# Altium PCB DB32.PcbDoc (part 7 of 8)
Units mil, origin at the board's own origin, x right, y up, seen from the top; angles counter-clockwise.
Board outline 3236.22 x 4456.69 mil, 8 copper layers (Top Layer, MidLayer1, MidLayer2, GND-Layer5, MidLayer3, VCC, MidLayer4, Bottom Layer), stack 61.8 mil thick; 207 components, 474 nets, 1777 pads, 1474 vias.
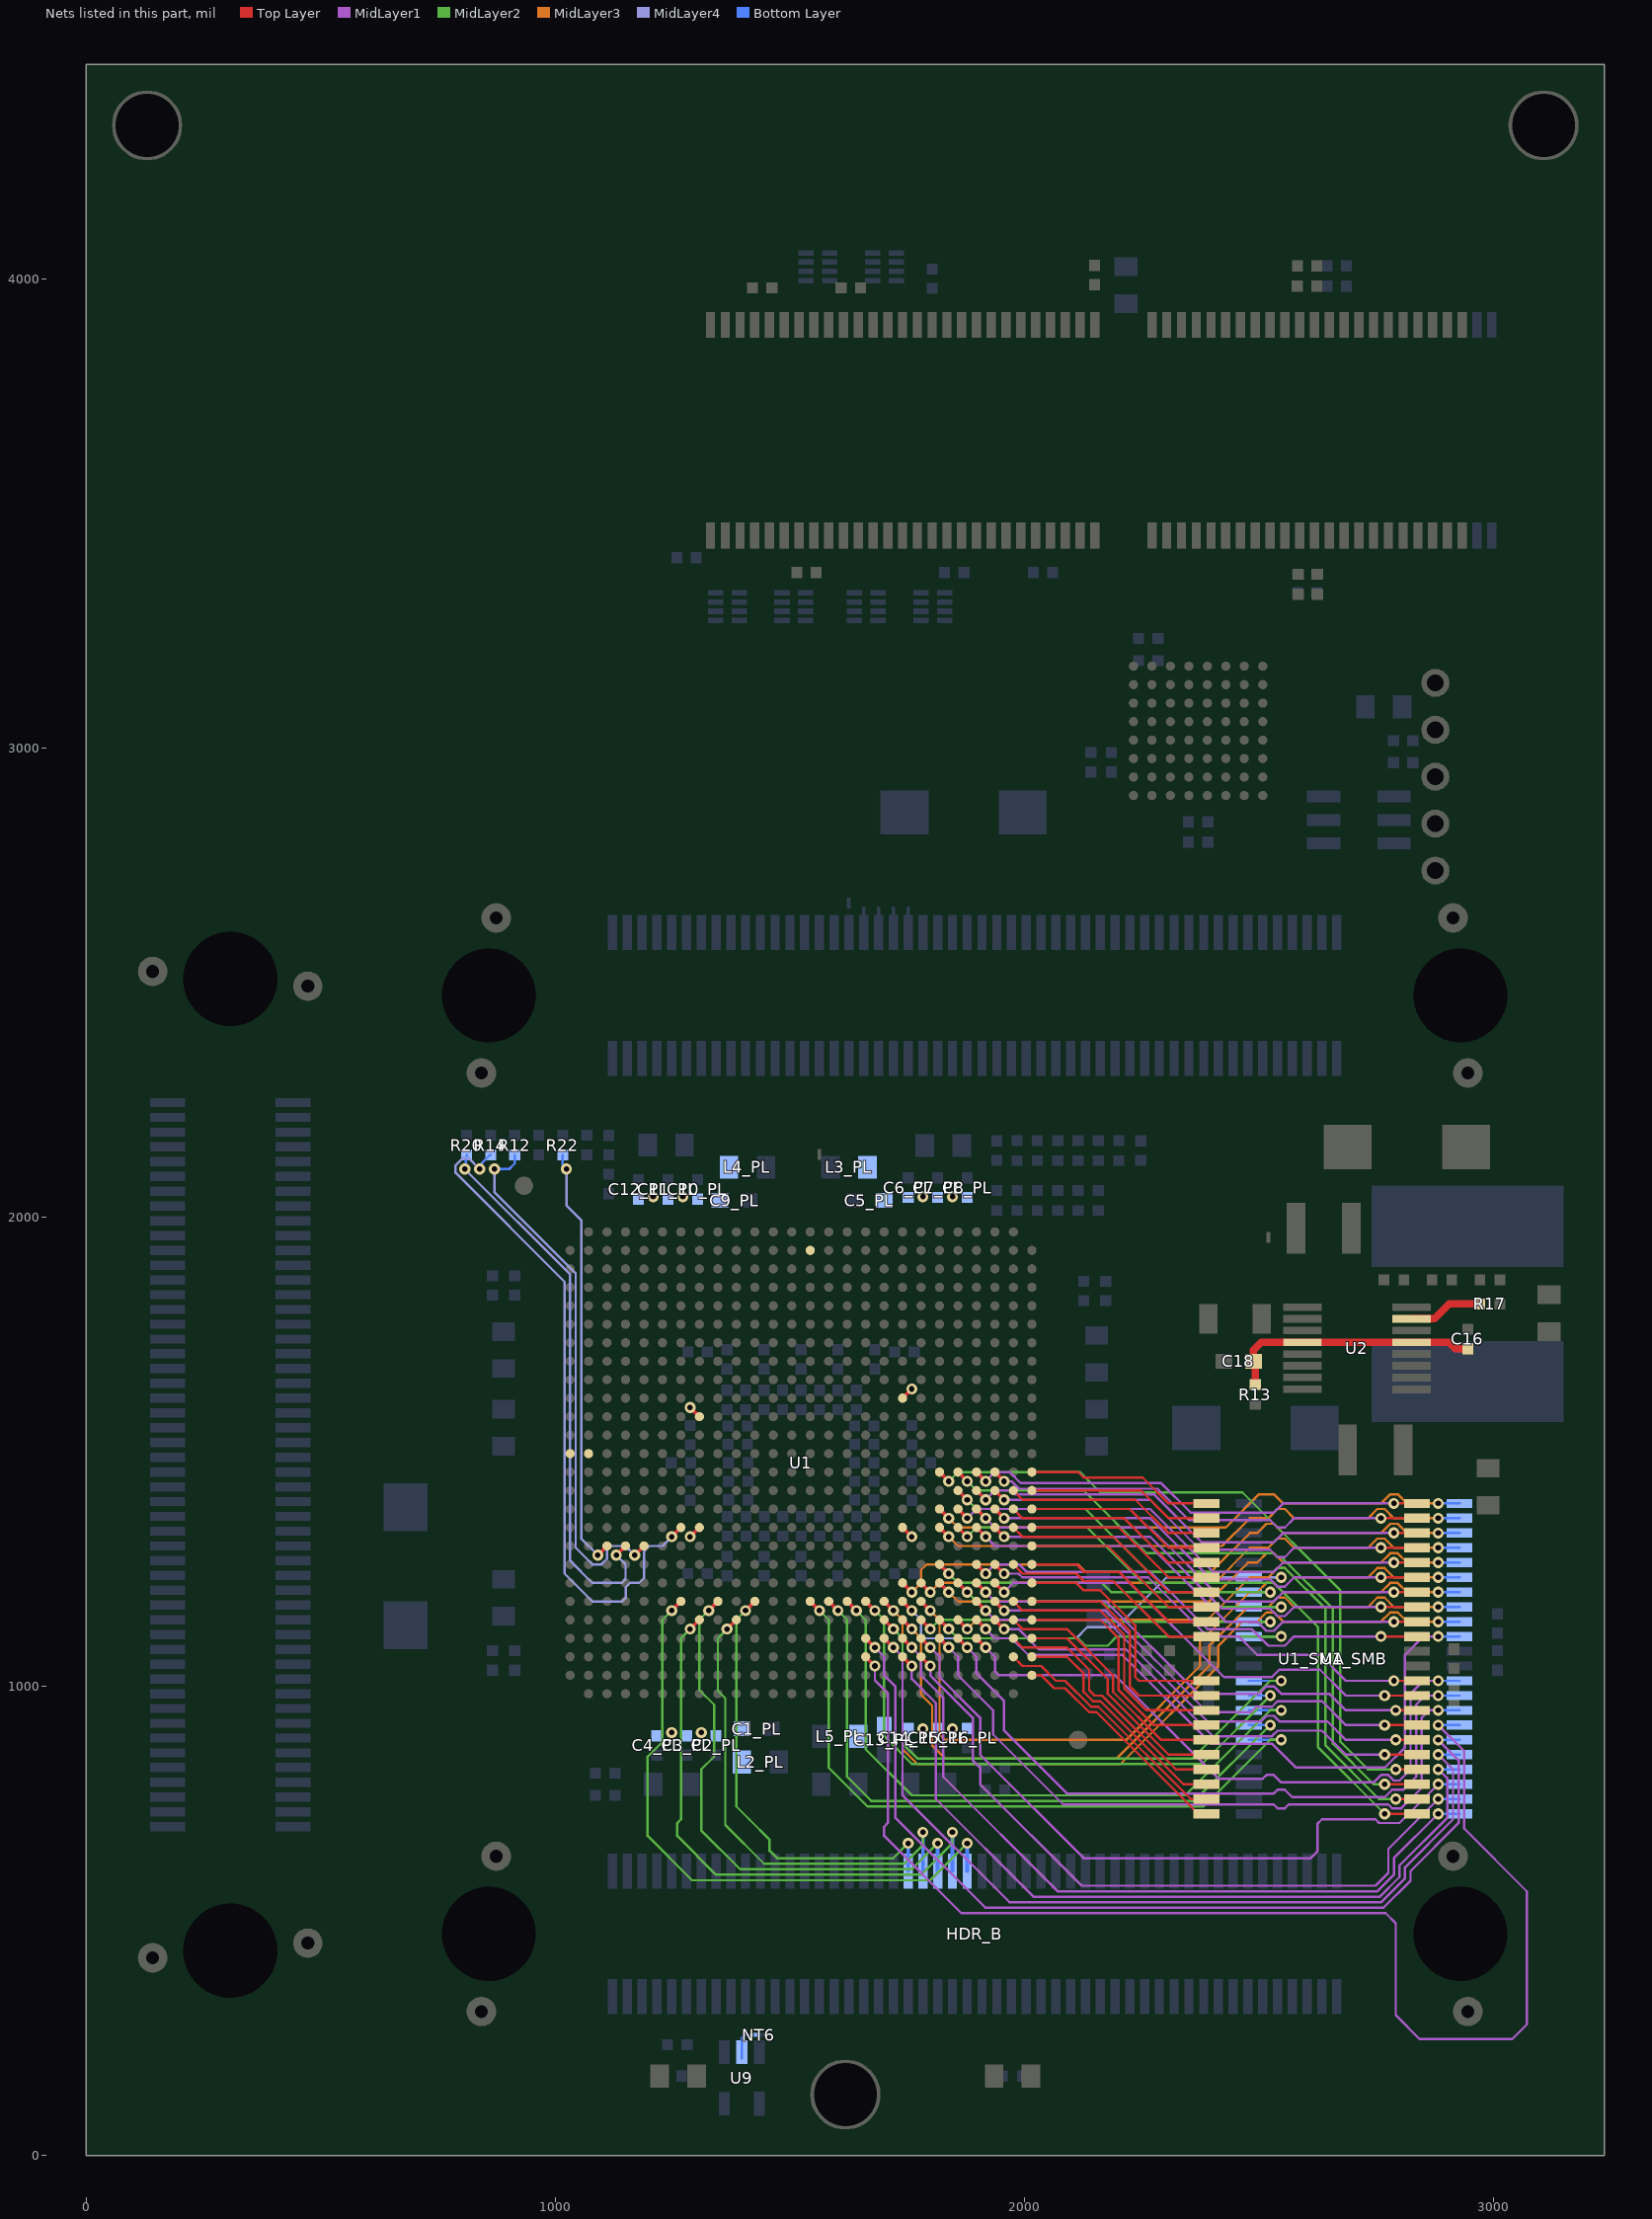
[diagram p13: the nets of this part, all layers, seen from the top]

## Via types
v1: diameter 23.62, hole 11.81, Top Layer to Bottom Layer, 839 vias
v2: diameter 23.62, hole 11.81, Top Layer to Bottom Layer, tented both sides, 499 vias
v3: diameter 27.56, hole 15.75, Top Layer to Bottom Layer, 135 vias
v4: diameter 23.62, hole 11.81, Top Layer to Bottom Layer, tented top, 1 vias

## Nets (pads, with @x,y where several pads share a name; then routed paths per layer and width w, separated by ;. In a path a pad name is that pad's centre, name@x,y a point inside that pad or via, vN(x,y) a via of type N, cw(c..) or ccw(c..) an arc to the next point about the centre after c; other vN are vias at no path point) (continued)
SRAM1_A10: U1.T21 U1_SMB.23 | length 1178.5
  Top Layer w7.87: U1.T21@1818.9,1377.95 v1(1838.59,1358.27)
  MidLayer3 w5: v1(1838.59,1358.27) 1858.27,1338.58 2078.74,1338.58 2090.55,1338.58 2429.16,1338.58 2500.01,1409.44 2531.7,1409.44 2551.38,1389.76 2759.84,1389.76 2779.53,1409.45 2795.28,1409.45 2814.97,1389.75 v1(2881.9,1389.75)
  Bottom Layer w5: v1(2881.9,1389.75) U1_SMB.23@2927.25,1389.75
SRAM1_A11: U1.U21 U1_SMB.24 | length 1181.8
  Top Layer w7.87: U1.U21@1818.9,1338.58 v1(1838.59,1318.9)
  MidLayer3 w5: v1(1838.59,1318.9) 1858.27,1299.21 2078.74,1299.21 2090.55,1299.21 2421.26,1299.21 2480.31,1358.27 2519.69,1358.27 2539.37,1377.95 2555.12,1377.95 2574.8,1358.27 2732.28,1358.27 2751.97,1377.95 2767.72,1377.95 2787.41,1358.26 v1(2881.9,1358.26)
  Bottom Layer w5: v1(2881.9,1358.26) U1_SMB.24@2927.25,1358.26
SRAM1_A12: U1.Y19 U1_SMB.25 | length 1309.2
  Top Layer w7.87: U1.Y19@1740.16,1220.47 v1(1759.84,1200.79)
  MidLayer3 w5: v1(1759.84,1200.79) 1779.53,1220.47 1779.53,1248.03 1791.34,1259.84 2078.74,1259.84 2090.55,1259.84 2114.17,1259.84 2129.92,1244.09 2397.66,1244.09 2480.33,1326.76 2496.27,1326.76 2515.96,1346.45 2531.7,1346.45 2551.38,1326.77 2759.84,1326.77 2779.53,1346.46 2795.28,1346.46 2814.97,1326.76 v1(2881.9,1326.76)
  Bottom Layer w5: v1(2881.9,1326.76) U1_SMB.25@2927.25,1326.76
SRAM1_A13: U1.Y20 U1_SMB.26 | length 1227.6
  Top Layer w7.87: U1.Y20@1779.53,1220.47 v1(1799.21,1200.79)
  MidLayer3 w5: v1(1799.21,1200.79) 1818.9,1220.47 2078.74,1220.47 2090.55,1220.47 2405.51,1220.47 2480.31,1295.28 2519.69,1295.28 2539.37,1314.96 2555.12,1314.96 2574.8,1295.28 2732.28,1295.28 2751.97,1314.96 2767.72,1314.96 2787.41,1295.27 v1(2881.9,1295.27)
  Bottom Layer w5: v1(2881.9,1295.27) U1_SMB.26@2927.25,1295.27
SRAM1_A14: U1.Y21 U1_SMB.27 | length 1191.5
  Top Layer w7.87: U1.Y21@1818.9,1220.47 v1(1838.58,1200.79)
  MidLayer3 w5: v1(1838.58,1200.79) 1858.27,1181.1 2078.74,1181.1 2090.55,1181.1 2393.7,1181.1 2476.37,1263.77 2496.27,1263.77 2515.96,1283.45 2531.7,1283.45 2551.38,1263.78 2759.84,1263.78 2779.53,1283.46 2795.28,1283.46 2814.97,1263.77 v1(2881.9,1263.77)
  Bottom Layer w5: v1(2881.9,1263.77) U1_SMB.27@2927.25,1263.77
SRAM1_A15: U1.AC20 U1_SMB.42 | length 1519.6
  Top Layer w7.87: U1.AC20@1779.53,1102.36 v1(1799.21,1082.68)
  MidLayer1 w5: v1(1799.21,1082.68) 1818.9,1062.99 1818.9,1019.69 1905.51,933.07 1905.51,921.26 1905.51,909.45 1905.51,854.33 2125.98,633.86 2610.24,633.86 2624.26,647.88 2624.26,706.94 2633.86,716.54 2748.03,716.54 2755.91,708.66 2799.21,708.66 v1(2881.9,791.33)
  Bottom Layer w5: v1(2881.9,791.33) U1_SMB.42@2927.25,791.33
SRAM1_A16: U1.AD20 U1_SMB.43 | length 1541.7
  Top Layer w7.87: U1.AD20@1779.53,1062.99 v1(1799.21,1043.31)
  MidLayer1 w5: v1(1799.21,1043.31) 1799.21,1023.62 1889.76,933.07 1889.76,921.26 1889.76,909.45 1889.76,842.52 1905.51,826.77 1905.51,791.34 2121.8,575.05 2748.28,575.05 2775.59,602.36 2775.59,653.54 v1(2881.9,759.83)
  Bottom Layer w5: v1(2881.9,759.83) U1_SMB.43@2927.25,759.83
SRAM1_A17: U1.AC19 U1_SMB.44 | length 1621.8
  Top Layer w7.87: U1.AC19@1740.16,1102.36 v1(1759.84,1082.68)
  MidLayer1 w5: v1(1759.84,1082.68) 1779.53,1062.99 1779.53,1023.62 1826.77,976.38 1826.77,921.26 1826.77,911.26 1826.77,807.09 2070.62,563.24 2752.21,563.24 2787.4,598.43 2787.4,633.86 v1(2881.9,728.34)
  Bottom Layer w5: v1(2881.9,728.34) U1_SMB.44@2927.25,728.34
SRAM1_A18: U1.AB22 U1_SMB.28 | length 1155.4
  Top Layer w7.87: U1.AB22@1858.27,1141.73 v1(1877.95,1122.05)
  MidLayer3 w5: v1(1877.95,1122.05) 1897.64,1141.73 2078.74,1141.73 2090.55,1141.73 2389.76,1141.73 2480.31,1232.28 2519.69,1232.28 2539.37,1251.97 2555.12,1251.97 2574.8,1232.28 2732.28,1232.28 2751.97,1251.97 2767.72,1251.97 2787.41,1232.28 v1(2881.9,1232.27)
  Bottom Layer w5: v1(2881.9,1232.27) U1_SMB.28@2927.25,1232.27
SRAM1_D0: U1.AA15 U1_SMB.7 | length 1429.5
  Top Layer w7.87: U1.AA15@1582.68,1181.1 v1(1602.36,1161.42)
  MidLayer2 w5: v1(1602.36,1161.42) 1622.05,1141.73 1622.05,921.26 1622.05,909.45 1622.05,807.09 1673.23,755.91 2362.2,755.91 2523.6,917.3 v1(2523.83,917.3)
  Bottom Layer w5: U1_SMB.7@2478.43,917.32 v1(2523.83,917.3) v1@2527.77,917.3
SRAM1_D1: U1.AA16 U1_SMB.8 | length 1405.6
  Top Layer w7.87: U1.AA16@1622.05,1181.1 v1(1641.73,1161.42)
  MidLayer2 w5: v1(1641.73,1161.42) 1661.42,1141.73 1661.42,921.26 1661.42,909.45 1661.42,866.14 1759.84,767.72 2342.52,767.72 2523.62,948.82 v1(2547.24,948.82)
  Bottom Layer w5: U1_SMB.8@2478.43,948.82 v1(2547.24,948.82) v1@2551.18,948.82
SRAM1_D2: U1.AA17 U1_SMB.9 | length 1261.1
  Top Layer w7.87: U1.AA17@1661.42,1181.1 v1(1681.1,1161.42)
  MidLayer2 w5: v1(1681.1,1161.42) 1700.79,1141.73 1700.79,921.26 1700.79,909.45 1700.79,893.7 1759.84,834.65 2378.17,834.65 v1(2523.83,980.31) v1@2523.61,980.31
  Bottom Layer w5: U1_SMB.9@2478.43,980.32 v1(2523.83,980.31) v1@2527.77,980.31
SRAM1_D3: U1.AB18 U1_SMB.10 | length 1241.5
  Top Layer w7.87: U1.AB18@1700.79,1141.73 v1(1720.47,1122.05)
  MidLayer2 w5: v1(1720.47,1122.05) 1740.16,1102.36 1740.16,921.26 1740.16,909.45 1740.16,877.95 1771.65,846.46 2358.27,846.46 2523.62,1011.81 v1(2547.24,1011.81)
  Bottom Layer w5: U1_SMB.10@2478.43,1011.81 v1(2547.24,1011.81) v1@2551.18,1011.81
SRAM1_D4: U1.AB21 U1_SMB.13 | length 832.1
  Top Layer w7.87: U1.AB21@1818.9,1141.73 v1(1838.58,1122.05)
  MidLayer2 w5: v1(1838.58,1122.05) 1858.27,1102.36 2078.74,1102.36 2090.55,1102.36 2114.17,1102.36 2129.92,1086.61 2177.17,1086.61 2196.85,1106.3 v1(2547.24,1106.3)
  Bottom Layer w5: U1_SMB.13@2478.43,1106.3 v1(2547.24,1106.3) v1@2551.18,1106.3
SRAM1_D5: U1.AB20 U1_SMB.14 | length 811.6
  Top Layer w7.87: U1.AB20@1779.53,1141.73 v1(1799.21,1122.05)
  MidLayer2 w5: v1(1799.21,1122.05) 1818.9,1141.73 2078.74,1141.73 2090.55,1141.73 2169.28,1141.73 2173.23,1137.79 v1(2523.83,1137.79)
  Bottom Layer w5: U1_SMB.14@2478.43,1137.8 v1(2523.83,1137.79) v1@2527.77,1137.79
SRAM1_D6: U1.Y22 U1_SMB.15 | length 782.9
  Top Layer w7.87: U1.Y22@1858.27,1220.47 v1(1877.95,1200.79)
  MidLayer2 w5: v1(1877.95,1200.79) 1897.64,1181.1 2078.74,1181.1 2090.55,1181.1 2165.35,1181.1 2177.17,1169.29 v1(2547.24,1169.29)
  Bottom Layer w5: U1_SMB.15@2478.43,1169.29 v1(2547.24,1169.29) v1@2551.18,1169.29
SRAM1_D7: U1.W21 U1_SMB.16 | length 778.7
  Top Layer w7.87: U1.W21@1818.9,1259.84 v1(1838.59,1240.16)
  MidLayer2 w5: v1(1838.59,1240.16) 1858.27,1220.47 2078.74,1220.47 2090.55,1220.47 2165.35,1220.47 2185.04,1200.79 v1@2523.83,1200.79
  Bottom Layer w5: U1_SMB.16@2478.44,1200.78 v1(2523.83,1200.78) v1@2527.77,1200.78
SRAM1_D8: U1.AA20 U1_SMB.29 | length 1606.1
  Top Layer w7.87: U1.AA20@1779.53,1181.1 v1(1799.21,1161.42)
  MidLayer3 w5: v1(1799.21,1161.42) 1818.9,1141.73 1818.9,921.26 1818.9,909.45 1818.9,897.64 1830.71,885.83 2216.54,885.83 2374.02,1043.31 2374.02,1094.49 2480.3,1200.78 2496.27,1200.78 2515.96,1220.46 2531.7,1220.46 2551.38,1200.79 2759.84,1200.79 2779.53,1220.47 2795.28,1220.47 2814.97,1200.78 v1(2881.9,1200.78)
  Bottom Layer w5: v1(2881.9,1200.78) U1_SMB.29@2927.25,1200.78
SRAM1_D9: U1.AB19 U1_SMB.30 | length 1621
  Top Layer w7.87: U1.AB19@1740.16,1141.73 v1(1759.84,1122.05)
  MidLayer3 w5: v1(1759.84,1122.05) 1779.53,1102.36 1779.53,982.28 1803.15,958.66 1803.15,921.26 1803.15,909.45 1803.15,874.02 1830.71,846.46 2196.85,846.46 2393.7,1043.31 2393.7,1086.61 2476.38,1169.29 2519.69,1169.29 2539.37,1188.98 2555.12,1188.98 2574.8,1169.29 2732.28,1169.29 2751.97,1188.98 2767.72,1188.98 2787.41,1169.29 v1(2881.9,1169.28)
  Bottom Layer w5: v1(2881.9,1169.28) U1_SMB.30@2927.25,1169.28
SRAM1_D10: U1.AA18 U1_SMB.31 | length 1715
  Top Layer w7.87: U1.AA18@1700.79,1181.1 v1(1720.47,1161.42)
  MidLayer3 w5: v1(1720.47,1161.42) 1740.16,1141.73 1740.16,921.26 1740.16,909.45 1740.16,866.14 1771.65,834.65 2204.72,834.65 2413.39,1043.31 2413.39,1086.61 2464.56,1137.79 2496.27,1137.79 2515.96,1157.47 2531.7,1157.47 2551.38,1137.8 2759.84,1137.8 2779.53,1157.48 2795.28,1157.48 2814.97,1137.79 v1(2881.9,1137.79)
  Bottom Layer w5: v1(2881.9,1137.79) U1_SMB.31@2927.25,1137.79
SRAM1_D11: U1.AB23 U1_SMB.32 | length 1395.5
  Top Layer w7.87: U1.AB23@1897.64,1141.73 v1(1917.32,1122.05)
  MidLayer1 w5: v1(1917.32,1122.05) 1937.01,1102.36 1972.44,1102.36 2007.88,1066.93 2078.74,1066.93 2090.55,1066.93 2208.66,1066.93 2397.64,877.95 2527.56,877.95 2578.75,826.76 2767.71,826.76 2811.02,870.08 2811.02,1066.93 2850.39,1106.3 2862.59,1106.3 ; 2858.28,1106.29 v1(2881.9,1106.29)
  Bottom Layer w5: v1(2881.9,1106.29) U1_SMB.32@2927.25,1106.29
SRAM1_D12: U1.AC23 U1_SMB.35 | length 1403.6
  Top Layer w7.87: U1.AC23@1897.64,1102.36 v1(1917.33,1082.68)
  MidLayer1 w5: 2862.21,1011.8 v1(2881.9,1011.8) ; 2862.2,1011.81 2850.39,1011.81 2822.83,984.25 2822.83,822.83 2799.21,799.21 2787.4,799.21 2775.6,811.02 2759.84,811.02 2744.09,795.27 2547.24,795.27 2531.5,811.02 2515.75,811.02 2507.87,803.15 2413.39,803.15 2192.91,1023.62 2090.55,1023.62 2078.74,1023.62 1944.88,1023.62 1937.01,1031.5 1937.01,1062.99 ; 1937.01,1062.99 v1(1917.33,1082.68) 1937.01,1062.99
  Bottom Layer w5: v1(2881.9,1011.8) U1_SMB.35@2927.25,1011.8
SRAM1_D13: U1.AC22 U1_SMB.36 | length 1453
  Top Layer w7.87: U1.AC22@1858.27,1102.36 v1(1877.96,1082.68)
  MidLayer1 w5: v1(1877.96,1082.68) 1897.64,1062.99 1897.64,1027.56 1956.69,968.5 1956.69,921.26 1956.69,909.45 1956.69,905.51 2090.55,771.65 2531.5,771.65 2539.37,779.53 2555.12,779.53 2570.87,763.78 2767.71,763.77 2783.46,779.52 2807.08,779.52 2834.65,807.09 2834.65,960.63 2854.33,980.32 2862.2,980.32 v1(2881.9,980.31)
  Bottom Layer w5: v1(2881.9,980.31) U1_SMB.36@2927.25,980.31
SRAM1_D14: U1.AC21 U1_SMB.37 | length 1492
  Top Layer w7.87: U1.AC21@1818.9,1102.36 v1(1838.59,1082.68)
  MidLayer1 w5: v1(1838.59,1082.68) 1858.27,1062.99 1858.27,1023.62 1933.07,948.82 1933.07,921.26 1933.07,909.45 1933.07,897.64 2082.68,748.03 2531.5,748.03 2539.37,740.16 2555.12,740.16 2562.99,748.03 2775.59,748.03 2783.46,740.16 2803.15,740.16 2846.46,783.46 2846.46,933.07 2862.2,948.82 v1(2881.9,948.81)
  Bottom Layer w5: v1(2881.9,948.81) U1_SMB.37@2927.25,948.81
SRAM1_D15: U1.AD17 U1_SMB.38 | length 2843.4
  Top Layer w7.87: U1.AD17@1661.42,1062.99 v1(1681.1,1043.3)
  MidLayer1 w5: v1(1681.1,1043.3) 1681.1,1012.79 1708.66,985.23 1708.66,921.26 1708.66,909.45 1708.66,708.66 1700.79,700.79 1700.79,681.1 1865.16,516.73 2769.68,516.73 2791.34,495.08 2791.34,299.21 2842.52,248.03 3039.37,248.03 3070.87,279.53 3070.87,562.99 2937.01,696.85 2937.01,862.2 v1(2881.9,917.31)
  Bottom Layer w5: v1(2881.9,917.31) U1_SMB.38@2927.25,917.31
SRAM1_NBHE: U1.AC18 U1_SMB.40 | length 1901.6
  Top Layer w7.87: U1.AC18@1700.79,1102.36 v1(1720.47,1082.68)
  MidLayer1 w5: v1(1720.47,1082.68) 1740.16,1062.99 1740.16,921.26 1740.16,909.45 1740.16,767.72 1967.77,540.11 2760.58,540.11 2811.02,590.55 2811.02,614.17 2913.39,716.54 2913.39,822.83 v1(2881.9,854.32)
  Bottom Layer w5: v1(2881.9,854.32) U1_SMB.40@2927.25,854.32
SRAM1_NBLE: U1.AC17 U1_SMB.39 | length 2015.4
  Top Layer w7.87: U1.AC17@1661.42,1102.36 v1(1681.1,1082.68)
  MidLayer1 w5: v1(1681.1,1082.68) 1700.79,1062.99 1700.79,1023.62 1724.41,1000 1724.41,921.26 1724.41,909.45 1724.41,720.47 1916.34,528.54 2765.75,528.54 2822.83,585.63 2822.83,606.3 2925.2,708.66 2925.2,842.52 v1(2881.9,885.82)
  Bottom Layer w5: v1(2881.9,885.82) U1_SMB.39@2927.25,885.82
SRAM1_NCS: U1.AA14 U1_SMB.6 | length 1500.9
  Top Layer w7.87: U1.AA14@1543.31,1181.1 v1(1562.99,1161.42)
  MidLayer2 w5: v1(1562.99,1161.42) 1582.68,1141.73 1582.68,921.26 1582.68,909.45 1582.68,826.77 1665.35,744.09 2381.89,744.09 2523.62,885.83 v1(2547.24,885.83)
  Bottom Layer w5: U1_SMB.6@2478.43,885.83 v1(2547.24,885.83) v1@2551.18,885.83
SRAM1_NOE: U1.AD19 U1_SMB.41 | length 1749.5
  Top Layer w7.87: U1.AD19@1740.16,1062.99 v1(1759.84,1043.31)
  MidLayer1 w5: v1(1759.84,1043.31) 1759.84,1015.75 1811.02,964.57 1811.02,921.26 1811.02,909.45 1811.02,759.84 2019.19,551.67 2757.38,551.67 2799.21,593.5 2799.21,618.11 2901.57,720.47 2901.57,803.15 v1(2881.9,822.83)
  Bottom Layer w5: v1(2881.9,822.83) U1_SMB.41@2927.25,822.83
SRAM1_NWE: U1.AA19 U1_SMB.17 | length 984.7
  Top Layer w7.87: U1.AA19@1740.16,1181.1 v1(1759.84,1161.42)
  MidLayer4 w5: v1(1759.84,1161.42) 1779.53,1141.73 1779.53,1110.24 1787.4,1102.36 2078.74,1102.36 2090.55,1102.36 2110.24,1102.36 2133.86,1125.98 2196.85,1125.98 2303.15,1232.28 v1(2547.24,1232.28)
  Bottom Layer w5: U1_SMB.17@2478.43,1232.28 v1(2547.24,1232.28) v1@2551.18,1232.28
SRAM2_A0: U1.U22 U1_SMA.1 | length 1397.4
  Top Layer w5: v1(2767.69,728.34) U1_SMA.1@2836.69,728.35
  Top Layer w7.87: U1.U22@1858.27,1338.58 v1(1877.96,1318.9)
  MidLayer2 w5: v1(1877.96,1318.9) 1897.64,1338.58 2078.74,1338.58 2090.55,1338.58 2133.86,1338.58 2251.97,1220.47 2531.5,1220.47 2625.98,1125.98 2625.98,870.08 v1(2767.69,728.34)
SRAM2_A1: U1.R22 U1_SMA.2 | length 1428
  Top Layer w5: v1(2791.34,759.84) U1_SMA.2@2836.69,759.84
  Top Layer w7.87: U1.R22@1858.27,1417.32 v1(1877.96,1397.64)
  MidLayer2 w5: v1(1877.96,1397.64) 1897.64,1377.95 2078.74,1377.95 2090.55,1377.95 2129.92,1377.95 2263.78,1244.09 2531.5,1244.09 2539.37,1251.97 2555.12,1251.97 2641.73,1165.35 2641.73,874.02 2755.91,759.84 v1(2791.34,759.84)
SRAM2_A2: U1.P22 U1_SMA.3 | length 1422.4
  Top Layer w5: v1(2767.69,791.34) U1_SMA.3@2836.69,791.34
  Top Layer w7.87: U1.P22@1858.27,1456.69 v1(1877.96,1437.01)
  MidLayer2 w5: v1(1877.96,1437.01) 1897.64,1417.32 2078.74,1417.32 2090.55,1417.32 2125.98,1417.32 2259.84,1283.46 2531.5,1283.46 2539.37,1275.59 2547.24,1275.59 2657.48,1165.35 2657.48,877.95 2744.1,791.34 v1(2767.69,791.34)
SRAM2_A3: U1.P21 U1_SMA.4 | length 1485.8
  Top Layer w5: v1(2791.34,822.83) U1_SMA.4@2836.69,822.84
  Top Layer w7.87: U1.P21@1818.9,1456.69 v1(1838.59,1437.01)
  MidLayer2 w5: v1(1838.59,1437.01) 1858.27,1456.69 2078.74,1456.69 2090.55,1456.69 2118.11,1456.69 2161.42,1413.39 2464.57,1413.39 2673.23,1204.72 2673.23,881.89 2732.28,822.83 v1(2791.34,822.83)
SRAM2_A4: U1.AB24 U1_SMA.5 | length 1020.7
  Top Layer w5: v1(2767.69,854.33) U1_SMA.5@2836.69,854.33
  Top Layer w7.87: U1.AB24@1937.01,1141.73 v1(1956.69,1122.05)
  MidLayer1 w5: v1(1956.69,1122.05) 1987.21,1122.05 2030.51,1078.74 2078.74,1078.74 2090.55,1078.74 2216.54,1078.74 2401.57,893.7 2527.56,893.7 2539.37,905.51 2633.86,905.51 2685.04,854.33 v1@2759.84,854.31
SRAM2_A5: U1.T22 U1_SMA.18 | length 1058.4
  Top Layer w5: v1@2787.4,1263.77 U1_SMA.18@2836.71,1263.77
  Top Layer w7.87: U1.T22@1858.27,1377.95 v1(1877.96,1358.27)
  MidLayer1 w5: v1(1877.96,1358.27) 1897.64,1377.95 2078.74,1377.95 2090.55,1377.95 2267.72,1377.95 2401.57,1244.09 2531.5,1244.09 2551.18,1263.78 v1(2787.4,1263.78)
SRAM2_A6: U1.R24 U1_SMA.19 | length 966.6
  Top Layer w5: v1(2759.84,1295.28) U1_SMA.19@2836.69,1295.28
  Top Layer w7.87: U1.R24@1937.01,1417.32 v1(1956.7,1397.64)
  MidLayer1 w5: v1(1956.7,1397.64) 2078.74,1397.64 2090.55,1397.64 2267.72,1397.64 2374.02,1291.34 2523.62,1291.34 2539.37,1275.59 2555.12,1275.59 2574.8,1295.28 v1(2759.84,1295.28)
SRAM2_A7: U1.R23 U1_SMA.20 | length 1009.2
  Top Layer w5: v1(2787.4,1326.77) U1_SMA.20@2836.69,1326.77
  Top Layer w7.87: U1.R23@1897.64,1417.32 v1(1917.33,1397.64)
  MidLayer1 w5: v1(1917.33,1397.64) 1937.01,1417.32 1972.44,1417.32 1980.32,1409.45 2078.74,1409.45 2090.55,1409.45 2275.59,1409.45 2377.95,1307.09 2531.5,1307.09 2551.18,1326.77 v1(2787.4,1326.77)
SRAM2_A8: U1.P24 U1_SMA.21 | length 956.8
  Top Layer w5: v1(2759.84,1358.27) U1_SMA.21@2836.69,1358.27
  Top Layer w7.87: U1.P24@1937.01,1456.69 v1(1956.7,1437.01)
  MidLayer1 w5: v1(1956.7,1437.01) 1972.44,1437.01 1988.19,1421.26 2078.74,1421.26 2090.55,1421.26 2283.46,1421.26 2350.39,1354.33 2523.62,1354.33 2539.37,1338.58 2555.12,1338.58 2574.8,1358.27 v1(2759.84,1358.27)
SRAM2_A9: U1.P23 U1_SMA.22 | length 999.4
  Top Layer w5: v1(2787.4,1389.76) U1_SMA.22@2836.69,1389.76
  Top Layer w7.87: U1.P23@1897.64,1456.69 v1(1917.33,1437.01)
  MidLayer1 w5: v1(1917.33,1437.01) 1937.01,1456.69 1968.5,1456.69 1992.13,1433.07 2078.74,1433.07 2090.55,1433.07 2291.34,1433.07 2354.33,1370.08 2531.5,1370.08 2551.18,1389.76 v1(2787.4,1389.76)
SRAM2_A10: U1.P26 U1_SMA.23 | length 399.9
  Top Layer w5: U1.P26@2015.75,1456.69 2078.74,1456.69 2090.55,1456.69 2114.17,1456.69 2125.98,1444.88 2251.97,1444.88 2307.1,1389.76 U1_SMA.23@2387.87,1389.76
SRAM2_A11: U1.R26 U1_SMA.24 | length 396.6
  Top Layer w5: U1.R26@2015.75,1417.32 2078.74,1417.32 2090.55,1417.32 2248.03,1417.32 2307.09,1358.26 U1_SMA.24@2387.87,1358.27
SRAM2_A12: U1.R25 U1_SMA.25 | length 449
  Top Layer w5: U1.R25@1976.38,1417.32 1996.06,1397.64 2078.74,1397.64 2090.55,1397.64 2236.22,1397.64 2307.09,1326.76 U1_SMA.25@2387.87,1326.77
SRAM2_A13: U1.T26 U1_SMA.26 | length 406.4
  Top Layer w5: U1.T26@2015.75,1377.95 2078.74,1377.95 2090.55,1377.95 2224.41,1377.95 2307.09,1295.27 U1_SMA.26@2387.87,1295.28
SRAM2_A14: U1.T25 U1_SMA.27 | length 458.8
  Top Layer w5: U1.T25@1976.38,1377.95 1996.06,1358.27 2078.74,1358.27 2090.55,1358.27 2212.6,1358.27 2307.09,1263.77 U1_SMA.27@2387.89,1263.77
SRAM2_A15: U1.AD26 U1_SMA.42 | length 507.7
  Top Layer w5: U1.AD26@2015.75,1062.99 2078.74,1062.99 2090.55,1062.99 2125.98,1027.56 2125.98,988.19 2145.67,968.5 2161.42,968.5 2338.59,791.33 U1_SMA.42@2387.87,791.34
SRAM2_A16: U1.AD25 U1_SMA.43 | length 537.1
  Top Layer w5: U1.AD25@1976.38,1062.99 1996.06,1043.31 2035.43,1043.31 2066.93,1011.81 2078.74,1011.81 2086.61,1011.81 2141.73,956.69 2157.48,956.69 2354.34,759.83 U1_SMA.43@2387.87,759.84
SRAM2_A17: U1.AE26 U1_SMA.44 | length 494.5
  Top Layer w5: U1.AE26@2015.75,1023.62 2035.43,1023.62 2062.99,996.06 2078.74,996.06 2086.61,996.06 2137.8,944.88 2153.54,944.88 2370.09,728.34 U1_SMA.44@2387.87,728.35
SRAM2_A18: U1.U26 U1_SMA.28 | length 416.2
  Top Layer w5: U1.U26@2015.75,1338.58 2078.74,1338.58 2090.55,1338.58 2200.79,1338.58 2307.09,1232.28 U1_SMA.28@2387.89,1232.28
SRAM2_D0: U1.AA24 U1_SMA.7 | length 1020.9
  Top Layer w5: v1(2767.69,917.32) U1_SMA.7@2836.69,917.32
  Top Layer w7.87: U1.AA24@1937.01,1181.1 v1(1956.7,1161.42)
  MidLayer1 w5: v1(1956.7,1161.42) 2078.74,1161.42 2090.55,1161.42 2173.23,1161.42 2389.76,944.88 2482.35,944.88 2494.16,956.69 2527.58,956.69 2539.11,968.23 2539.11,968.5 2633.86,968.5 2685.06,917.3 v1@2759.84,917.3
SRAM2_D1: U1.Y23 U1_SMA.8 | length 1060.7
  Top Layer w5: v1(2791.34,948.82) U1_SMA.8@2836.69,948.82
  Top Layer w7.87: U1.Y23@1897.64,1220.47 v1(1917.32,1200.79)
  MidLayer1 w5: v1(1917.32,1200.79) 1937.01,1181.1 2078.74,1181.1 2090.55,1181.1 2173.23,1181.1 2370.08,984.25 2500,984.25 2515.75,1000 2531.5,1000 2547.24,984.25 2649.61,984.25 2685.04,948.83 v1@2787.41,948.83
SRAM2_D2: U1.Y24 U1_SMA.9 | length 1020.7
  Top Layer w5: v1(2767.69,980.31) U1_SMA.9@2836.69,980.32
  Top Layer w7.87: U1.Y24@1937.01,1220.47 v1(1956.69,1200.79)
  MidLayer1 w5: v1(1956.69,1200.79) 1976.38,1220.47 2078.74,1220.47 2090.55,1220.47 2224.41,1220.47 2425.2,1019.68 2527.56,1019.68 2543.31,1035.43 2629.92,1035.43 2685.04,980.32 ; 2685.04,980.29 v1@2759.84,980.29
SRAM2_D3: U1.W24 U1_SMA.10 | length 1002.4
  Top Layer w5: v1(2787.4,1011.81) U1_SMA.10@2836.69,1011.81
  Top Layer w7.87: U1.W24@1937.01,1259.84 v1(1956.7,1240.16)
  MidLayer1 w5: v1(1956.7,1240.16) 1987.21,1240.16 1995.08,1232.28 2078.74,1232.28 2090.55,1232.28 2263.78,1232.28 2389.76,1106.3 2456.69,1106.3 2496.06,1066.93 2629.92,1066.93 2685.03,1011.82 v1(2787.4,1011.81)
SRAM2_D4: U1.W23 U1_SMA.13 | length 1035.3
  Top Layer w5: v1(2759.84,1106.3) U1_SMA.13@2836.69,1106.3
  Top Layer w7.87: U1.W23@1897.64,1259.84 v1(1917.33,1240.16)
  MidLayer1 w5: v1(1917.33,1240.16) 1937.01,1259.84 1988.19,1259.84 2003.94,1244.09 2078.74,1244.09 2090.55,1244.09 2267.72,1244.09 2389.76,1122.05 2484.25,1122.05 2519.68,1086.62 2555.11,1086.62 2574.79,1106.31 v1(2759.84,1106.3)
SRAM2_D5: U1.U23 U1_SMA.14 | length 1038.6
  Top Layer w5: v1(2787.4,1137.8) U1_SMA.14@2836.69,1137.8
  Top Layer w7.87: U1.U23@1897.64,1338.58 v1(1917.33,1318.9)
  MidLayer1 w5: v1(1917.33,1318.9) 1937.01,1299.21 2078.74,1299.21 2090.55,1299.21 2267.72,1299.21 2429.13,1137.8 2496.06,1137.8 2515.75,1118.11 2531.49,1118.11 2551.17,1137.8 ; 2551.17,1137.8 v1(2787.4,1137.8)
SRAM2_D6: U1.U24 U1_SMA.15 | length 986.1
  Top Layer w5: v1(2759.84,1169.29) U1_SMA.15@2836.69,1169.29
  Top Layer w7.87: U1.U24@1937.01,1338.58 v1(1956.7,1318.9)
  MidLayer1 w5: v1(1956.7,1318.9) 2078.74,1318.9 2090.55,1318.9 2267.72,1318.9 2421.25,1165.36 2523.61,1165.36 2539.36,1149.61 2555.11,1149.61 2574.79,1169.3 v1(2759.84,1169.29)
SRAM2_D7: U1.T23 U1_SMA.16 | length 1028.8
  Top Layer w5: v1(2787.4,1200.79) U1_SMA.16@2836.69,1200.79
  Top Layer w7.87: U1.T23@1897.64,1377.95 v1(1917.33,1358.27)
  MidLayer1 w5: v1(1917.33,1358.27) 1937.01,1338.58 2078.74,1338.58 2090.55,1338.58 2267.72,1338.58 2425.2,1181.1 2531.49,1181.1 ; 2531.49,1181.11 2551.17,1200.8 ; 2551.17,1200.8 v1(2787.4,1200.79)
SRAM2_D8: U1.U25 U1_SMA.29 | length 468.6
  Top Layer w5: U1.U25@1976.38,1338.58 1996.06,1318.9 2078.74,1318.9 2090.55,1318.9 2188.98,1318.9 2307.09,1200.78 U1_SMA.29@2387.87,1200.79
SRAM2_D9: U1.V26 U1_SMA.30 | length 426
  Top Layer w5: U1.V26@2015.75,1299.21 2078.74,1299.21 2090.55,1299.21 2177.17,1299.21 2307.09,1169.28 U1_SMA.30@2387.87,1169.29
SRAM2_D10: U1.W26 U1_SMA.31 | length 422.7
  Top Layer w5: U1.W26@2015.75,1259.84 2078.74,1259.84 2090.55,1259.84 2110.24,1259.84 2125.98,1244.09 2200.79,1244.09 2307.09,1137.79 U1_SMA.31@2387.87,1137.8
SRAM2_D11: U1.W25 U1_SMA.32 | length 475.1
  Top Layer w5: U1.W25@1976.38,1259.84 1996.06,1240.16 2078.74,1240.16 2090.55,1240.16 2110.24,1240.16 2125.98,1224.41 2188.98,1224.41 2307.09,1106.29 U1_SMA.32@2387.87,1106.3
SRAM2_D12: U1.Y26 U1_SMA.35 | length 523.1
  Top Layer w5: U1.Y26@2015.75,1220.47 2078.74,1220.47 2090.55,1220.47 2110.24,1220.47 2125.98,1204.72 2161.42,1204.72 2236.22,1129.92 2236.22,1019.68 2244.1,1011.8 U1_SMA.35@2387.87,1011.81
SRAM2_D13: U1.AA26 U1_SMA.36 | length 524.5
  Top Layer w5: U1.AA26@2015.75,1181.1 2078.74,1181.1 2090.55,1181.1 2161.42,1181.1 2224.41,1118.11 2224.41,1000 2244.1,980.31 U1_SMA.36@2387.87,980.32
SRAM2_D14: U1.AA25 U1_SMA.37 | length 574.6
  Top Layer w5: U1.AA25@1976.38,1181.1 1996.06,1161.42 2078.74,1161.42 2090.55,1161.42 2161.42,1161.42 2212.6,1110.24 2212.6,996.06 2259.85,948.81 U1_SMA.37@2387.87,948.82
SRAM2_D15: U1.AB26 U1_SMA.38 | length 529.7
  Top Layer w5: U1.AB26@2015.75,1141.73 2078.74,1141.73 2090.55,1141.73 2161.42,1141.73 2200.79,1102.36 2200.79,992.13 2275.6,917.32 U1_SMA.38@2387.87,917.32
SRAM2_NBHE: U1.AC26 U1_SMA.40 | length 493.3
  Top Layer w5: U1.AC26@2015.75,1102.36 2078.74,1102.36 2090.55,1102.36 2177.17,1015.75 2177.17,984.25 2307.09,854.32 U1_SMA.40@2387.87,854.33
SRAM2_NBLE: U1.AB25 U1_SMA.39 | length 538.3
  Top Layer w5: U1.AB25@1976.38,1141.73 1996.06,1122.05 2078.74,1122.05 2090.55,1122.05 2188.98,1023.62 2188.98,988.19 2291.35,885.82 U1_SMA.39@2387.87,885.83
SRAM2_NCS: U1.AA23 U1_SMA.6 | length 1067.2
  Top Layer w5: v1(2791.34,885.83) U1_SMA.6@2836.69,885.83
  Top Layer w7.87: U1.AA23@1897.64,1181.1 v1(1917.33,1161.42)
  MidLayer1 w5: v1(1917.33,1161.42) 1937.01,1141.73 1976.38,1141.73 2078.74,1141.73 2090.55,1141.73 2173.23,1141.73 2389.76,925.2 2503.93,925.2 2515.75,937.01 2531.5,937.01 2543.31,925.2 2645.67,925.2 2685.03,885.83 v1@2787.41,885.83
SRAM2_NOE: U1.AC25 U1_SMA.41 | length 552.7
  Top Layer w5: U1.AC25@1976.38,1102.36 1996.06,1082.68 2078.74,1082.68 2090.55,1082.68 2137.8,1035.43 2137.8,992.13 2149.61,980.32 2165.35,980.32 2322.84,822.83 U1_SMA.41@2387.87,822.84
SRAM2_NWE: U1.T24 U1_SMA.17 | length 976.3
  Top Layer w5: v1(2759.84,1232.28) U1_SMA.17@2836.71,1232.28
  Top Layer w7.87: U1.T24@1937.01,1377.95 v1(1956.7,1358.27)
  MidLayer1 w5: v1(1956.7,1358.27) 2078.74,1358.27 2090.55,1358.27 2267.72,1358.27 2397.63,1228.35 2523.61,1228.35 2539.36,1212.61 2555.11,1212.61 2574.79,1232.29 v1(2759.84,1232.28)
STATUS_LED: NT6.1 U9.2 | length 70.8
  Bottom Layer w5: U9.2@1397.64,207.68 1397.64,250.22 1404.53,257.11 NT6.1@1423,257.11
SW0: HDR_B.42 U1.AA11 | length 951.1
  Top Layer w7.87: v1(1405.51,1161.42) U1.AA11@1425.2,1181.1
  MidLayer2 w5: v1(1405.51,1161.42) 1385.83,1141.73 1385.83,921.26 1385.83,909.45 1385.83,744.09 1413.39,716.54 1456.69,673.23 1456.69,649.61 1472.44,633.86 1720.47,633.86 v2(1751.97,665.35)
  Bottom Layer w7.87: HDR_B.42@1751.97,606.3 v2(1751.97,665.35)
SW1: HDR_B.44 U1.AB10 | length 1041.9
  Top Layer w7.87: v1(1366.14,1122.05) U1.AB10@1385.83,1141.73
  MidLayer2 w5: v1(1366.14,1122.05) 1346.46,1102.36 1346.46,990.15 1362.2,974.41 1362.2,921.26 1362.2,909.45 1362.2,704.72 1444.88,622.05 1744.09,622.05 1783.46,661.42 v2(1783.46,688.98)
  Bottom Layer w7.87: HDR_B.44@1783.47,606.3 v2(1783.46,688.98)
SW2: HDR_B.46 U1.AA9 | length 1149
  Top Layer w7.87: v1(1326.77,1161.42) U1.AA9@1346.46,1181.1
  MidLayer2 w5: v1(1326.77,1161.42) 1307.09,1141.73 1307.09,1086.61 1307.09,992.12 1338.58,960.63 1338.58,921.26 1338.58,909.45 1338.58,850.39 1311.02,822.83 1311.02,692.91 1393.7,610.24 1759.84,610.24 v2(1814.96,665.35)
  Bottom Layer w7.87: HDR_B.46@1814.96,606.3 v2(1814.96,665.35)
SW3: HDR_B.48 U1.AB8 | length 1235.1
  Top Layer w7.87: v1(1287.4,1122.05) U1.AB8@1307.09,1141.73
  MidLayer2 w5: v1(1287.4,1122.05) 1267.72,1102.36 1267.72,921.26 1267.72,909.45 1267.72,716.54 1259.84,708.66 1259.84,681.1 1342.52,598.43 1779.53,598.43 1846.46,665.35 v2(1846.46,688.98)
  Bottom Layer w7.87: HDR_B.48@1846.46,606.3 v2(1846.46,688.98)
SW4: HDR_B.50 U1.AA7 | length 1341.3
  Top Layer w7.87: v1(1248.03,1161.42) U1.AA7@1267.72,1181.1
  MidLayer2 w5: v1(1248.03,1161.42) 1228.35,1141.73 1228.35,921.26 1228.35,909.45 1228.35,881.89 1196.85,850.39 1196.85,681.1 1291.34,586.61 1799.21,586.61 v2(1877.95,665.35)
  Bottom Layer w7.87: HDR_B.50@1877.96,606.3 v2(1877.95,665.35)
TCK: R14.2 U1.U7 | length 1458.2
  Top Layer w7.87: v1(1248.03,1318.9) U1.U7@1267.72,1338.58
  MidLayer4 w5: v1(838.58,2102.36) 814.96,2125.98 803.15,2125.98 787.4,2110.24 787.4,2094.49 1019.68,1862.2 1019.68,1240.16 1078.74,1181.1 1141.98,1181.1 1149.81,1188.93 1149.81,1211.08 1159.4,1220.67 1178.65,1220.67 1188.98,1231 1188.98,1287.4 1200.79,1299.21 1228.35,1299.21 v1(1248.03,1318.9)
  Bottom Layer w5: v1(838.58,2102.36) 838.58,2110.24 860.7,2132.36 R14.2@862.2,2132.36
TDI: R20.2 U1.V4 | length 1186
  Top Layer w7.87: v1(1129.92,1279.53) U1.V4@1149.61,1299.21
  MidLayer4 w5: v1(807.09,2102.36) 1031.5,1877.95 1031.5,1267.72 1078.74,1220.47 1141.73,1220.47 1149.61,1228.35 1149.61,1259.84 v1(1129.92,1279.53)
  Bottom Layer w5: v1(807.09,2102.36) R20.2@811.02,2132.36
TDO: R22.2 U1.V3 | length 911.7
  Top Layer w7.87: v1(1090.55,1279.53) U1.V3@1110.24,1299.21
  MidLayer4 w5: v1(1023.62,2102.36) 1023.62,2025.05 1055.12,1993.55 1055.12,1314.96 v1(1090.55,1279.53)
  Bottom Layer w5: R22.2@1015.75,2132.36 1015.74,2110.24 v1(1023.62,2102.36)
TMS: R12.2 U1.V5 | length 1149.7
  Top Layer w7.87: v1(1169.29,1279.53) U1.V5@1188.98,1299.21
  MidLayer4 w5: v1(870.08,2102.36) 870.08,2053.51 1043.31,1880.28 1043.31,1295.28 1078.74,1259.84 1098.43,1259.84 1110.24,1271.65 1110.24,1291.34 1118.11,1299.21 1149.6,1299.21 v1(1169.29,1279.53)
  Bottom Layer w5: v1(870.08,2102.36) 901.57,2102.36 913.38,2114.17 R12.2@913.38,2132.36
TOFF: R17.1 U2.7 | length 159.5
  Top Layer w15.75: U2.7@2824.58,1783.25 2824.8,1783.46 2874.02,1783.46 2905.51,1814.96 R17.1@2970.94,1814.96
UGCLK0: U1.B14
UGCLK1: U1.N1
UGCLK2: U1.N2
VCCA_PLL1: C1_PL.1 C2_PL.1 C3_PL.1 C4_PL.1 L2_PL.2 U1.U8 | length 27.8
  Top Layer w7.87: v1(1287.4,1318.9) U1.U8@1307.09,1338.58
  other v1: 1248.03,901.57 1311.02,901.57
VCCA_PLL2: C5_PL.1 C6_PL.1 C7_PL.1 C8_PL.1 L3_PL.2 U1.K19 | length 27.8
  Top Layer w7.87: U1.K19@1740.16,1614.17 v1(1759.84,1633.86)
  other v1: 1783.46,2043.31 1846.46,2043.31
VCCA_PLL3: C9_PL.1 C10_PL.1 C11_PL.1 C12_PL.1 L4_PL.2 U1.L8 | length 27.8
  Top Layer w7.87: v1(1287.4,1594.49) U1.L8@1307.09,1574.8
  other v1: 1208.66,2043.31 1271.65,2043.31
VCCA_PLL4: C13_PL.1 C14_PL.1 C15_PL.1 C16_PL.1 L5_PL.2 U1.U19 | length 27.8
  Top Layer w7.87: U1.U19@1740.16,1338.58 v1(1759.84,1318.9)
  other v1: 1783.46,909.45 1846.46,909.45
VFILT: C16.1 C18.1 R13.2 U2.5 U2.12 | length 544.3
  Top Layer w15.75: R13.2@2492.12,1643.23 2492.12,1688.98 C18.1@2488.18,1692.91 2488.19,1716.54 2504.9,1733.25 U2.12@2592.58,1733.25 ; U2.12@2592.58,1733.25 U2.5@2824.58,1733.25 2904.53,1733.27 2918.31,1719.48 C16.1@2944.88,1719.48
pads on no net: HDR_B.93 HDR_B.95 HDR_B.MH5 HDR_B.MH6 HDR_L.MH5 HDR_L.MH6 HDR_T.95 HDR_T.MH5 HDR_T.MH6 MH1.MOUNT MH2.MOUNT MH3.MOUNT U1.A7 U1.A8 U1.A12 U1.A13 U1.A17 U1.A18 U1.AA13 U1.AB3 U1.AB14 U1.AC5 U1.AC9 U1.AC15 U1.AD4 U1.AD5 U1.AD14 U1.AE13 U1.AE25 U1.B6 U1.B8 U1.B13 U1.B17 U1.B18 U1.B19 U1.B22 U1.B23 U1.B24 U1.C7 U1.C9 U1.C13 U1.C18 U1.D4 U1.D7 U1.D9 U1.E4 U1.E6 U1.E7 U1.E8 U1.E9 U1.E11 U1.E17 U1.E21 U1.F5 U1.F7 U1.F8 U1.F19 U1.FID1 U1.G5 U1.G7 U1.G10 U1.H5 U1.H6 U1.J5 U1.J6 U1.J7 U1.K5 U1.K6 U1.K25 U1.L5 U1.L6 U1.L7 U1.L22 U1.L25 U1.L26 U1.M1 U1.M6 U1.M23 U1.M24 U1.M25 U1.M26 U1.N4 U1.N5 U1.N6 U1.N21 U1.N24 U1.N25 U1.N26 U1.P2 U1.P5 U1.P25 U1.V6 U1_CM.A1 U1_CM.A8 U1_CM.B1 U1_CM.B4 U1_CM.C1 U1_CM.D1 U1_CM.E1 U1_CM.F8 U1_CM.G1 U1_CM.G8 U1_CM.H1 U1_CM.H8 U1_ID.5 U2_CM.40 U3_CM.40 U9.1
copper on no net: | length 8826
  Top Layer w5: 1208.66,2019.68 1208.66,1948.82 1228.35,1929.14 ; 1267.72,1968.51 1267.72,1980.32 1291.34,2003.94 1291.34,2031.5 ; 1307.09,1929.14 1287.4,1948.82 1287.4,1980.31 1307.09,2000 1307.09,2031.5 ; 1307.09,1968.5 1307.09,1984.25 1322.83,2000 1322.83,2031.5 ; 1464.57,1968.5 1464.57,1984.25 1472.44,1992.12 1472.44,2031.5 ; 1523.62,933.07 1523.62,1043.31 1543.31,1062.99 ; 1661.42,1929.13 1681.1,1948.82 1681.1,1984.25 1677.17,1988.19 1677.17,2031.5 ; 1661.42,1968.5 1661.42,2031.5 ; 1692.91,2031.5 1692.91,1992.13 1700.79,1984.25 1700.79,1968.5 ; 1700.79,1929.13 1720.47,1948.82 1720.47,1984.25 1708.66,1996.06 1708.66,2031.5 ; 1740.16,1929.14 1759.84,1948.82 1759.84,1980.31 1740.16,2000 1740.16,2031.5 ; 1858.27,1929.14 1877.95,1948.82 1877.95,2031.5 ; 1897.64,1929.14 1917.32,1948.82 1917.32,2031.5 ; 1937.01,1496.06 1956.69,1476.38 2078.74,1476.38 ; 1937.01,1929.14 1956.69,1948.82 1956.69,2031.49 ; 1976.37,1023.63 2031.5,968.5 2078.74,968.5 ; 1976.38,1535.43 1996.06,1555.12 2078.74,1555.12 ; 1976.38,1574.8 1996.06,1594.49 2078.74,1594.49 ; 1976.38,1614.17 1996.06,1633.86 2078.74,1633.86 ; 2015.75,1496.06 2078.74,1496.06 ; 2015.75,1535.43 2078.74,1535.43 ; 2015.75,1574.8 2078.74,1574.8
  Top Layer w7.87: v1(1129.92,1043.31) 1149.61,1062.99 ; v1(1129.92,1830.71) 1149.61,1811.02 ; v1(1129.92,1870.08) 1149.61,1850.39 ; v1(1169.29,1043.31) 1188.98,1062.99 ; v1(1169.29,1082.68) 1188.98,1102.36 ; v1(1169.29,1594.49) 1188.98,1574.8 ; v1(1169.29,1633.86) 1188.98,1614.17 ; v1(1169.29,1673.23) 1188.98,1653.54 ; v1(1169.29,1712.6) 1188.98,1692.91 ; v1(1169.29,1751.97) 1188.98,1732.28 ; v1(1169.29,1791.34) 1188.98,1771.65 ; v1(1208.66,1279.53) 1228.35,1299.21 ; v1(1208.66,1515.75) 1228.35,1496.06 ; v1(1208.66,1555.12) 1228.35,1535.43 ; v1(1208.66,1594.49) 1228.35,1574.8 ; v1(1208.66,1633.86) 1228.35,1614.17 ; v1(1208.66,1673.23) 1228.35,1653.54 ; v1(1208.66,1712.6) 1228.35,1692.91 ; v1(1208.66,1830.71) 1228.35,1811.02 ; v1(1248.03,1594.49) 1267.72,1574.8 ; v1(1248.03,1673.23) 1267.72,1653.54 ; v1(1248.03,1751.97) 1267.72,1732.28 ; v1(1248.03,1791.34) 1267.72,1771.65 ; v1(1248.03,1830.71) 1267.72,1811.02 ; v1(1248.03,1870.08) 1267.72,1850.39 ; v1(1248.03,1909.45) 1267.72,1889.76 ; v1(1287.4,1791.34) 1307.09,1771.65 ; v1(1287.4,1830.71) 1307.09,1811.02 ; v1(1326.77,1082.68) 1346.46,1102.36 ; v1(1326.77,1830.71) 1346.46,1811.02 ; v1(1326.77,1870.08) 1346.46,1850.39 ; v1(1326.77,1909.45) 1346.46,1889.76 ; v1(1366.14,1751.97) 1385.83,1732.28 ; v1(1405.51,1830.71) 1425.2,1811.02 ; v1(1484.25,1161.42) 1503.94,1181.1 ; v1(1484.25,1909.45) 1503.94,1889.76 ; 1582.67,1102.37 v1(1602.36,1082.68) ; 1661.42,1811.02 v1(1681.1,1830.71) ; 1700.79,1889.76 v1(1720.47,1909.45) ; 1740.16,1771.65 v1(1759.84,1791.34) ; 1818.9,1811.02 v1(1838.58,1830.71) ; 1858.27,1574.8 v1(1877.96,1594.49) ; 1897.64,1535.43 v1(1917.33,1555.12) ; 1937.01,1535.43 v1(1956.7,1555.12) ; 3149.61,4212.6 3149.61,4330.71 ; v1(1090.55,1122.05) 1110.24,1141.73 v1(1090.55,1122.05)
  MidLayer1 w5: 1153.54,921.26 1153.54,1023.62 1149.61,1027.56 1149.61,1062.99 v1(1169.29,1082.68) ; 1240.16,2031.5 1240.16,1940.95 1248.03,1933.07 v1(1248.03,1909.45) ; 1307.09,921.26 1307.09,1062.99 v1(1326.77,1082.68) ; 1311.02,2031.5 1311.02,1948.82 1307.09,1944.88 1307.09,1889.76 v1(1326.77,1870.08) ; v1(1326.77,1909.45) 1326.77,2031.49 ; 1582.68,921.26 1582.68,1062.99 v1(1602.36,1082.68) ; 968.51,1122.04 v1(1090.55,1122.05) 968.51,1122.05
  MidLayer2 w5: 968.5,1574.8 1188.98,1574.8 v1(1208.66,1594.49) ; 968.5,1614.17 1188.98,1614.17 v1(1208.66,1633.86) ; 968.51,1653.54 1149.61,1653.54 v1(1169.29,1633.86) ; 968.51,1692.91 1149.61,1692.91 v1(1169.29,1673.23) ; 968.51,1732.29 1188.97,1732.29 v1(1208.66,1712.6) ; 968.51,1771.65 1149.61,1771.65 v1(1169.29,1751.97) ; 1024.32,1850.71 1185.86,1850.71 1205.86,1830.71 v1(1208.66,1830.71) ; 1050.04,1810.85 1257.59,1810.85 1267.92,1821.18 1267.92,1848.01 1248.03,1867.9 v1(1248.03,1870.08) ; v1(1129.92,1870.08) 1149.44,1889.6 1149.44,1947.41 ; 1189.3,1921.94 1189.3,1861.41 1200,1850.71 1228.03,1850.71 v1(1248.03,1830.71) ; 1244.09,2031.5 1244.09,1964.57 1267.72,1940.94 1267.72,1889.76 1267.72,1862.35 1287.4,1842.67 v1(1287.4,1830.71) ; 1456.69,921.26 1456.69,976.38 1464.57,984.26 1464.57,1086.61 1464.57,1141.73 v1(1484.25,1161.42)
  MidLayer3 w5: 968.5,1259.84 1188.97,1259.84 v1(1208.66,1279.53) ; 1078.2,1653.24 1188.67,1653.24 v1(1208.66,1673.23) ; 1081.89,1692.74 1219.56,1692.74 1228.05,1684.25 1228.05,1665.07 1208.66,1645.68 v1(1208.66,1633.86) ; 1082.26,1613.8 1216.09,1613.8 1228.52,1626.23 1228.52,1641.9 1248.03,1661.41 v1(1248.03,1673.23) ; v1(1208.66,1712.6) v1@1214.41,1712.6
  MidLayer4 w5: v1(1405.51,1830.71) 1425.2,1850.39 1425.2,2031.5 ; v1(1484.25,1909.45) 1484.25,2031.5 ; 1661.42,2031.5 1661.42,1850.39 v1(1681.1,1830.71) ; v1(1877.96,1594.49) 1897.64,1574.8 2078.74,1574.8
  other v1: 1618.11,43.31 1456.69,59.06 1771.65,59.06 1556.86,68.68 1679.36,68.68 1531.5,129.92 1704.72,129.92 1556.86,191.17 1679.36,191.17 1618.11,216.54 129.92,4240.16 3106.3,4240.16 68.68,4265.53 191.17,4265.53 3045.05,4265.53 3167.54,4265.53 43.31,4326.77 216.54,4326.77 3019.68,4326.77 3192.91,4326.77 68.68,4388.02 191.17,4388.02 3045.05,4388.02 3167.54,4388.02 129.92,4413.39 3106.3,4413.39

## Polygon pours and split planes (outlines as drawn)
GND on Top Layer "GROUND-TOP-LAYER" (solid, remove dead copper, pour order 1015): 19.68,4132.62 298.72,4132.62 298.72,4409.45 2929.63,4409.45 2929.63,4132.62 3208.66,4132.62 3208.66,19.68 1813.48,19.68 1813.48,296.52 1414.86,296.52 1414.86,19.68 19.68,19.68
AGND on Top Layer "AGND-TOP" (solid, remove dead copper, pour order 1014): 2377.61,2077.57 2377.61,1677.17 3088.3,1677.17 3088.3,2077.57
GND on MidLayer1 "GROUND-MID1-LAYER" (solid, remove dead copper, pour order 1016): 19.68,4132.62 298.72,4132.62 298.72,4409.45 2929.63,4409.45 2929.63,4132.62 3208.66,4132.62 3208.66,19.68 1813.48,19.68 1813.48,296.52 1414.86,296.52 1414.86,19.68 19.68,19.68
1V2 on MidLayer1 "FPGAPWR-ML1-1V2" (solid, pour order 1012): 1472.36,1857.68 1472.36,2031.21 1575.03,2031.21 1575.03,1854.05 1811.25,1854.05 1901.81,1763.5 1901.81,1523.34 2078.97,1523.34 2078.97,1424.91 1901.81,1424.91 1901.81,1188.69 1811.25,1098.14 1575.03,1098.14 1575.03,920.98 1472.67,920.98 1472.67,1098.14 1236.45,1098.14 1145.9,1188.69 1145.9,1424.91 968.74,1424.91 968.74,1527.28 1145.9,1527.28 1145.9,1771.37 1228.58,1854.05
1V2 on MidLayer1 "1V2-connect-to-L1-C17" (solid, remove dead copper, pour order 1013): 1988.19,1417.32 3157.48,1417.32 3157.48,2244.09 2442.91,2244.09 2442.91,1706.69 1988.19,1706.69
GND on MidLayer2 "GROUND-MID2-LAYER" (solid, remove dead copper, pour order 1017): 19.68,4132.62 298.72,4132.62 298.72,4409.45 2929.63,4409.45 2929.63,4132.62 3208.66,4132.62 3208.66,19.68 1813.48,19.68 1813.48,296.52 1414.86,296.52 1414.86,19.68 19.68,19.68
GND on MidLayer3 "GROUND-MID3-LAYER" (solid, remove dead copper, pour order 1018): 19.68,4132.62 298.72,4132.62 298.72,4409.45 2929.63,4409.45 2929.63,4132.62 3208.66,4132.62 3208.66,19.68 1813.48,19.68 1813.48,296.52 1414.86,296.52 1414.86,19.68 19.68,19.68
VCCA_PLL1 on MidLayer3 "VCCA_PLL1_MID3" (solid, remove dead copper, pour order 1009): 1330.71,881.89 1224.41,881.89 1224.41,1334.65 1224.41,1334.64 1311.02,1334.64 1311.02,948.82 1330.71,948.82
VCCA_PLL3 on MidLayer3 "VCCA_PLL3_MID3" (solid, remove dead copper, pour order 1011): 1385.36,1575.4 1185.04,1574.8 1185.04,2059.06 1385.83,2059.03
GND on MidLayer4 "GROUND-MID4-LAYER" (solid, remove dead copper, pour order 1019): 19.68,4132.62 298.72,4132.62 298.72,4409.45 2929.63,4409.45 2929.63,4132.62 3208.66,4132.62 3208.66,19.68 1813.48,19.68 1813.48,296.52 1414.86,296.52 1414.86,19.68 19.68,19.68
VCCA_PLL4 on MidLayer4 "VCCA_PLL4_MID4" (solid, remove dead copper, pour order 1000): 1862.2,893.7 1862.2,1334.65 1728.96,1334.65 1728.96,1213.64 1710.75,1213.64 1696.85,1200 1697.65,1199.21 1697.65,1050 1722.34,1050 1733,1039.54 1733,893.7
VCCA_PLL2 on MidLayer4 "VCCA_PLL2_MID4" (solid, remove dead copper, pour order 1010): 1696.85,2062.99 1866.14,2062.99 1866.14,2019.68 1783.46,2019.68 1783.46,1618.11 1696.85,1618.11
GND on Bottom Layer "GROUND-BOTTOM-LAYER" (solid, remove dead copper, pour order 1020): 19.68,4132.62 298.72,4132.62 298.72,4409.45 2929.63,4409.45 2929.63,4132.62 3208.66,4132.62 3208.66,19.68 1813.48,19.68 1813.48,296.52 1414.86,296.52 1414.86,19.68 19.68,19.68
VCCA_PLL1 on Bottom Layer "VCCA_PLL1_BL" (solid, remove dead copper, pour order 1005): 1429.13,803.15 1429.13,933.07 1192.91,933.07 1192.91,881.89 1366.14,881.89 1366.14,803.15
VCCA_PLL2 on Bottom Layer "VCCA_PLL2_BL" (solid, remove dead copper, pour order 1006): 1657.48,2145.67 1714.47,2145.67 1714.47,2062.99 1897.64,2062.99 1897.64,2019.68 1665.62,2019.68 1665.62,2055.12 1657.48,2055.12
VCCA_PLL3 on Bottom Layer "VCCA_PLL3_BL" (solid, remove dead copper, pour order 1007): 1389.76,2157.5 1334.65,2157.5 1334.65,2064.48 1157.48,2064.48 1157.48,2015.75 1381.89,2015.75 1381.89,2055.62 1389.76,2055.62
VCCA_PLL4 on Bottom Layer "VCCA_PLL4_BL" (solid, remove dead copper, pour order 1008): 1901.57,932.67 1901.57,884.98 1666.7,884.98 1666.7,850.3 1618.11,850.3 1618.11,937.01 1901.57,937.01
GND on Bottom Layer "FPGAPWR-BL-GND" (solid, remove dead copper, pour order 1001): 1397.64,1602.36 1649.61,1602.36 1649.61,1350.39 1397.64,1350.39
1V2 on Bottom Layer "1V2-BL" (solid, remove dead copper, pour order 1004): 1433.07,2240.16 1433.07,2059.06 1602.36,2059.06 1602.36,2149.61 2559.06,2149.61 2559.06,2066.93 3070.87,2066.93 3070.87,2240.16
3V3 on Bottom Layer "FPGAPWR-BL-3V3" (solid, pour order 1002): 1303.15,1704.72 1303.15,1259.84 1746.76,1259.84 1746.76,1704.72
1V2 on Bottom Layer "FPGAPWR-BL-1V2" (solid, pour order 1003): 1083.33,1956.69 1979.86,1956.69 2003.88,1932.68 2003.88,1020.08 1979.86,996.06 1067.32,996.06 1043.31,1020.08 1043.31,1932.68 1067.32,1956.69
GND on GND-Layer5 (split plane): 3216.12,4436.6 3216.12,20.1 20.1,20.1 20.1,4436.6 1523.62,4436.6
3V3 on VCC (split plane): 1523.62,4436.6 2701.84,4436.6 2701.84,4061.24 2702.17,4058.67 2703.17,4056.27 2704.74,4054.22 2720.98,4037.98 2721.87,4037.3 2723.04,4036.4 2725.43,4035.41 2728,4035.07 3041.89,4035.07 3106.07,3970.89 3106.07,2319.11 3064.6,2277.64 2921.43,2277.64 2802.3,2396.78 2800.24,2398.36 2797.84,2399.35 2795.28,2399.69 2629.92,2399.69 2627.35,2399.35 2624.96,2398.36 2622.9,2396.78 2617,2390.88 2615.42,2388.82 2614.43,2386.43 2614.09,2383.86 2614.09,2206.87 2429.99,2022.77 2428.41,2020.71 2427.42,2018.32 2427.08,2015.75 2427.08,1590.55 2427.42,1587.98 2428.41,1585.59 2429.99,1583.53 2445.74,1567.78 2447.79,1566.21 2450.19,1565.21 2452.76,1564.88 2582.68,1564.88 2585.25,1565.21 2587.64,1566.21 2589.7,1567.78 2618.29,1596.37 2712.19,1596.37 2725.07,1583.49 2725.07,1440 2725.41,1437.43 2726.4,1435.04 2727.98,1432.98 2732.98,1427.98 2735.04,1426.4 2737.43,1425.41 2740,1425.07 3005.77,1425.07 3045.19,1385.65 3045.19,1287.4 3045.19,1244.09 3045.19,795.45 2948.64,698.9 2838.58,698.9 2836.01,698.57 2833.62,697.57 2831.56,696 2780.38,644.82 2778.8,642.76 2777.81,640.36 2777.47,637.8 2777.47,523.8 2617,363.32 2615.42,361.26 2614.43,358.87 2614.09,356.3 2614.09,20.1 20.1,20.1 20.1,4436.6 1523.62,4436.6
5V0 on VCC (split plane): 3216.12,4436.6 3216.12,20.1 2633.94,20.1 2633.94,352.19 2794.42,512.67 2796,514.72 2796.99,517.12 2797.33,519.68 2797.33,633.68 2842.69,679.05 2952.76,679.05 2955.33,679.39 2957.72,680.38 2959.78,681.96 3062.14,784.32 3063.03,785.48 3063.72,786.37 3064.01,787.08 3064.71,788.77 3065.05,791.34 3065.05,1244.09 3065.05,1287.4 3065.05,1389.76 3064.71,1392.33 3063.72,1394.73 3062.82,1395.89 3062.14,1396.78 3016.9,1442.02 3014.85,1443.6 3012.45,1444.59 3009.88,1444.93 2744.93,1444.93 2744.93,1587.6 2744.59,1590.17 2743.6,1592.56 2742.02,1594.62 2723.32,1613.32 2721.26,1614.9 2718.87,1615.89 2716.3,1616.23 2614.17,1616.23 2611.6,1615.89 2609.21,1614.9 2607.15,1613.32 2578.57,1584.73 2456.87,1584.73 2446.94,1594.66 2446.94,2011.64 2631.04,2195.74 2632.61,2197.79 2633.6,2200.19 2633.94,2202.76 2633.94,2379.75 2634.03,2379.84 2791.16,2379.84 2910.3,2260.7 2911.2,2260.01 2912.36,2259.12 2914.75,2258.13 2917.32,2257.79 3068.72,2257.79 3071.29,2258.13 3073.68,2259.12 3075.74,2260.7 3123.02,2307.98 3124.6,2310.04 3125.59,2312.43 3125.93,2315 3125.93,3975 3125.59,3977.57 3124.6,3979.96 3123.7,3981.13 3123.02,3982.02 3053.02,4052.02 3050.96,4053.6 3048.57,4054.59 3046,4054.93 2732.11,4054.93 2721.69,4065.35 2721.69,4436.6

## Keep-outs
Bottom Layer:
  rectangle: 1310.91,4194.61 1507.76,4289.09
  rectangle: 255.91,3149.61 452.76,3244.09
  rectangle: 2643.7,3334.65 2840.55,3417.32
Keep-Out Layer:
  circle w15.75: c2928.82,472.44 r118.11
  circle w15.75: c857.95,472.44 r118.11
  circle w15.75: c306.77,437.01 r118.11
  circle w15.75: c306.77,2507.87 r118.11
  circle w15.75: c857.95,2472.44 r118.11
  circle w15.75: c2928.82,2472.44 r118.11
  region: 3236.22,4456.69 3212.6,4456.69 3212.6,0 3236.22,0
  rectangle: 0,0 23.62,4456.69
  rectangle: 0,0 3236.22,23.62
  region: 0,4456.69 0,4433.07 3236.22,4433.07 3236.22,4456.69
Mechanical 4:
  rectangle: 236.22,4358.27 925.2,4456.69

## Other copper
Top Layer:
  rectangle net GND: 3093.5,1773.6 3142.6,1785.4
  rectangle net GND: 2645.67,2551.18 2740.16,2692.91
  rectangle net 5V0: 2645.67,2251.97 2740.16,2393.7
  region net LX: 2768.7,1712.6 2645.67,1712.6 2645.67,1622.32 2768.7,1622.32
  rectangle net 1V2: 2850.39,2100 3027.56,2195
  rectangle net 5V0: 2824.06,1449.65 2951.2,1558.01
  rectangle net 5V0: 2881.48,1479.25 3013.03,1700.34
  rectangle net GND: 3011.8,1366.15 3031.49,1405.52
  pour cut-out: 2554.02,3195 2554.02,2865 2194.02,2865 2194.02,3195
  pour cut-out: 995.43,2007.56 2055.43,2007.56 2055.43,947.56 995.43,947.56
Bottom Layer:
  rectangle net GND: 2645.67,598.43 2740.16,696.85
  rectangle net 5V0: 2645.67,251.97 2740.16,346.46
  rectangle net GND: 2645.67,2598.43 2740.16,2696.85
  rectangle net 3V3: 2562.99,570.86 2610.24,704.72
  rectangle net 3V3: 2562.99,2570.86 2610.24,2704.72
  rectangle net 5V0: 2645.67,2248.03 2740.16,2346.46
  rectangle net 5V0: 2629.92,2248.03 2740.16,2346.46
  rectangle net 1V2: 2641.13,1901.74 2787.4,2043.82
  rectangle net 1V2: 2850.39,1972.44 3031.5,2196.85
  rectangle net LX: 2645.67,1622.05 2767.72,1712.6
  region net LX: 2455.79,1920.32 2455.79,2040.32 2305.79,2040.32 2305.79,1920.32
GND-Layer5 (plane layer: these items are gaps in the copper):
  text "GND" at 1645.67,437.01 h60
VCC (plane layer: these items are gaps in the copper):
  lines w19.68: 2624.02,0 2624.02,356.3 2787.4,519.68 2787.4,637.8 2838.58,688.98 2952.76,688.98 3055.12,791.34 3055.12,1244.09 3055.12,1287.4 3055.12,1389.76 3009.88,1435 2740,1435 2735,1440 2735,1587.6 2716.3,1606.3 2614.17,1606.3 2582.68,1574.8 2452.76,1574.8 2437.01,1590.55 2437.01,2015.75 2624.02,2202.76 2624.02,2383.86 2629.92,2389.76 2795.28,2389.76 2917.32,2267.72 3068.72,2267.72 3116,2315 3116,3975 3046,4045 2728,4045 2711.76,4061.24 2711.76,4456.69
  text "5V0" at 2791.34,1826.77 h60
  text "3V3" at 1657.48,437.01 h60